# EAGLE board circuit for solar panel (EAGLE 9.7.0)

Size 144.76 x 100.21 mm. Coordinates in mm from the lower left corner, seen from the top.
Outline: 0,0 144.76,0 144.76,100.21 0,100.21 0,0
Copper layers (1*16): Top 0.035mm / dielectric 1.5mm / Bottom 0.035mm
Design rules "default": minimum track width 6mil, minimum drill 0.35mm, track to track 6mil, track to pad 6mil, pad to pad 6mil, via to via 6mil, smd to smd 6mil, copper to edge 40mil, drill to drill 6mil, minimum pad ring 10mil, minimum via ring 8mil, stop-mask expansion 4mil, vias tented up to drill 0mil, thermal gap 10mil

## Footprints (pad centres in the part's own frame; a part is rotated, then mirrored left to right if it is on the bottom)
RESAD1016W63L850D250B = drill 0.83 pad 1.43: 1 -5.08,0; 2 5.08,0
GL5528 = drill 0.8 pad 1.4: 1 -1.702,0; 2 1.702,0
BATTERY-GENERIC = drill 1.118 pad 3.15 octagon: + 2.54,0; - -2.54,0
SG90 = drill 1.016 long: 1 -2.54,0; 2 0,0; 3 2.54,0
ARDUINO-UNO-R3-SHIELD = drill 1.016 pad 1.88: 3.3V 24.13,-2.54; 5V 24.13,0; A0 24.13,12.7; A1 24.13,15.24; A2 24.13,17.78; A3 24.13,20.32; A4 24.13,22.86; A5 24.13,25.4; AREF -24.13,-13.97; D2 -24.13,20.32; D3 -24.13,17.78; D4 -24.13,15.24; D5 -24.13,12.7; D6 -24.13,10.16; D7 -24.13,7.62; D8 -24.13,3.81; D9 -24.13,1.27; D10 -24.13,-1.27; D11 -24.13,-3.81; D12 -24.13,-6.35; D13 -24.13,-8.89; GND@0 24.13,2.54; GND@1 24.13,5.08; GND@2 -24.13,-11.43; IOREF 24.13,-7.62; NC 24.13,-10.16; RES 24.13,-5.08; RX -24.13,25.4; SCL -24.13,-19.05; SDA -24.13,-16.51; TX -24.13,22.86; VIN 24.13,7.62

## Placement (x,y rotation side)
R1  10k  [RESAD1016W63L850D250B]  110.52,24.01 330 top
R2  PHOTOCELL_GL5528  [GL5528]  114.92,22.74 270 top
R3  PHOTOCELL_GL5528  [GL5528]  132.7,27.82 270 top
R4  PHOTOCELL_GL5528  [GL5528]  127.62,27.82 270 top
R5  PHOTOCELL_GL5528  [GL5528]  137.78,27.82 270 top
R6  PHOTOCELL_GL5528  [GL5528]  122.54,27.82 270 top
SC1  BATTERYGENERIC  [BATTERY-GENERIC]  49.39,8.26 0 top
SERVOPITCH.SERVO  SERVOSG90  [SG90]  133.74,93.94 0 top
SERVOYAW.SERVO  SERVOSG90  [SG90]  105.53,93.34 0 top
U1  ARDUINO-UNO-R3-SHIELD  [ARDUINO-UNO-R3-SHIELD]  47.88,45.21 270 top

## Library data of the parts
R1-R6 SC1 SERVOPITCH.SERVO SERVOYAW.SERVO U1 = Tinkercad

## Nets
R2_2: R1.2 R2.2
SC1+: SC1.+ SERVOPITCH.SERVO.2 SERVOYAW.SERVO.2 U1.5V
SC1-: R1.1 SC1.- SERVOPITCH.SERVO.1 SERVOYAW.SERVO.1 U1.GND@0 U1.GND@1 U1.GND@2
U1_A0: R6.1 U1.A0
U1_A1: R4.1 U1.A1
U1_A2: R3.1 U1.A2
U1_A3: R5.1 U1.A3
U1_D9: SERVOYAW.SERVO.3 U1.D9
U1_D10: SERVOPITCH.SERVO.3 U1.D10

## Tracks (layer width: path | path; a pad name or v marks a point on that pad's centre or on a via)
R2_2  (1 unrouted)
SC1+  (3 unrouted)
SC1-  (6 unrouted)
U1_A0  (1 unrouted)
U1_A1  (1 unrouted)
U1_A2  (1 unrouted)
U1_A3  (1 unrouted)
U1_D9  (1 unrouted)
U1_D10  (1 unrouted)